# Altium PCB LED_Control.PcbDoc (part 2 of 2)
Units mil, origin at the board's own origin, x right, y up, seen from the top; angles counter-clockwise.
Board outline 2900 x 5000 mil, 4 copper layers (Top Layer, GND1, GND2, Bottom Layer), stack 51.864 mil thick; 104 components, 87 nets, 410 pads, 194 vias.
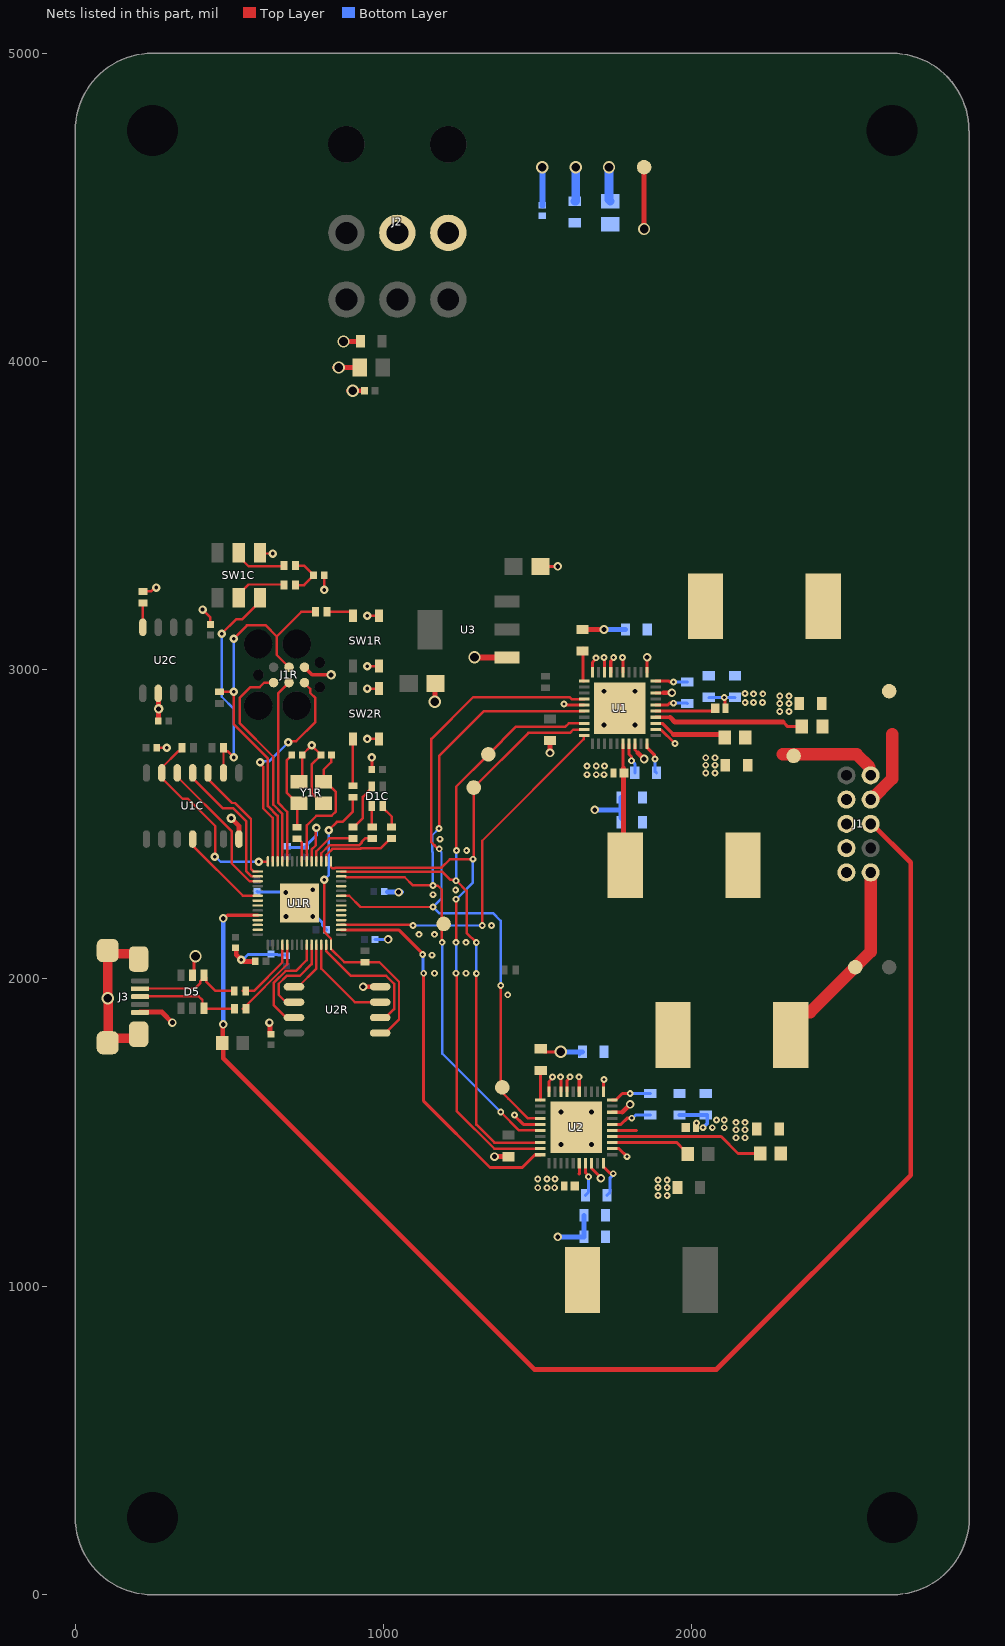
[diagram p4: the nets of this part, all layers, seen from the top]

## Via types
v1: diameter 22, hole 10, Top Layer to Bottom Layer, tented both sides, 103 vias
v2: diameter 27.56, hole 11.81, Top Layer to Bottom Layer, tented both sides, 33 vias
v3: diameter 28, hole 16, Top Layer to Bottom Layer, tented both sides, 20 vias
v4: diameter 31.5, hole 15.75, Top Layer to Bottom Layer, tented both sides, 17 vias
v5: diameter 40, hole 28, Top Layer to Bottom Layer, tented both sides, 14 vias
v6: diameter 45.28, hole 27.56, Top Layer to Bottom Layer, tented both sides, 4 vias
v7: diameter 40, hole 20, Top Layer to Bottom Layer, tented both sides, 3 vias

## Nets (pads, with @x,y where several pads share a name; then routed paths per layer and width w, separated by ;. In a path a pad name is that pad's centre, name@x,y a point inside that pad or via, vN(x,y) a via of type N, cw(c..) or ccw(c..) an arc to the next point about the centre after c; other vN are vias at no path point) (continued)
DBG_TX_RP2040: J1R.5 U1R.27 | length 714.8
  Top Layer w7.87: v2(599.17,2700.16) 599.17,2695.54 609.02,2685.7 609.02,2551.29 640.51,2519.79 U1R.27@640.51,2378.8 ; v2(691.32,2765.12) 694.47,2768.26 716.49,2768.26 778.7,2830.48 778.7,2908.65 761.83,2925.53 761.83,2938.56 743.27,2957.12 J1R.5@743.27,2958.62
  Bottom Layer w7.87: v2(599.17,2700.16) 602.9,2703.88 630.09,2703.88 v2(691.32,2765.12)
DIN_1: U1.10 U1R.3 | length 1212
  Top Layer w8: U1R.3@862.46,2172.6 862.52,2172.53 1093.26,2172.53 v1(1095,2170.8) ; v1(1320.13,2170.8) 1320,2170.92 1320,2445.8 1649.08,2774.88 1649.08,2786.19 1650.08,2787.19 U1.10@1650.5,2787.19
  Bottom Layer w8: v1(1095,2170.8) v1(1320.13,2170.8)
DIN_2: U1R.2 U2.10 | length 1261.3
  Top Layer w9.84: U1R.2@862.46,2156.85 1048.95,2156.85 1126.9,2078.9 v1(1126.9,2076.25) ; v1@1130,2015.8 1130,1600.8 1345,1385.8 1450,1385.8 1491.32,1427.11 1508.92,1427.11 U2.10@1509,1427.19
  Bottom Layer w9.84: v1(1126.9,2076.25) 1128.45,2074.7 1128.45,2017.35 v1@1130,2015.8
  other v1: 1130,2015.96
GND: C1.2 C1C.2 C1R.2 C2.2 C2C.1 C2R.2 C3.2 C3C.2 C3R.2 C4.1 C4C.2 C4R.2 C5.2 C5C.2 C5R.2 C6R.2 C7.2 C7R.2 C8R.2 C9.1 C9R.2 C10.2 C10R.2 C11.2 C11R.2 C12.2 C12R.2 C13.2 C13R.2 C14.2 C15.2 C16.2 C17.1 C18.2 C20.2 C21.2 C22.2 C23.2 C24.2 C25.2 C26.2 C28.1 C29.2 C30.2 D1.2 D2.2 D3.2 D4.2 D5.2 J1.1 J1.3 J1.5 J1.7 J1R.6 J2.2 J3.5 J3.6 J3.7 J3.8 J3.9 R6C.2 SW1C.6 SW1R.B1 SW1R.B2 SW2R.B1 SW2R.B2 U1.5 U1.22 U1.35 U1.37 U1.38 U1.40 U1.41 U1C.7 U1R.19 U1R.57 U2.5 U2.22 U2.35 U2.37 U2.38 U2.40 U2.41 U2C.2 U2R.4 U3.1 Y1R.2 Y1R.4 | length 4979.7
  Top Layer w7.87: R6C.2@219.06,3254.29 245.63,3254.29 258.43,3267.09 v2(262.56,3267.09) ; v2(412.79,3195.6) 438.47,3169.91 438.47,3148.02 C3C.2@438.94,3147.56 ; SW1C.6@599.17,3379.29 601.14,3377.32 v2(640.51,3377.32) ; U1R.57@766.5,2290.71 v4(770.43,2286.77) ; U1R.19@766.5,2378.8 766.5,2417.3 780.42,2431.21 780.42,2485.73 v2(782.24,2487.56) ; v2(807.24,3259.21) C2C.1@807.24,3306.46 ; v2(947.6,2775.94) SW2R.B1@985,2775.94 ; v2(947.6,2939.33) SW2R.B2@985,2939.33 ; v2(947.6,3012.16) 981.14,3012.16 SW1R.B1@981.26,3012.05 ; v2(947.6,3175.55) SW1R.B2@985,3175.55
  Top Layer w8: C1C.2@261.81,2747.4 C1C.2@263.94,2747.4 v2(296.81,2747.4) ; Y1R.2@725.87,2637.16 736.38,2647.68 C2R.2@736.38,2723.78 736.38,2724.57 v2@766.5,2754.68 ; v2(766.5,2755.27) v2@766.5,2754.68 ; Y1R.4@805.87,2567.16 799.96,2567.16 766.43,2600.69 766.43,2692.81 796.61,2722.99 C1R.2@796.61,2723.78 796.61,2724.57 v2@766.5,2754.68 ; SW1R.B1@981.26,3012.05 SW1R.B1@983.94,3014.72
  Top Layer w9.84: C5C.2@961.97,2676.53 v2(961.97,2715.9) ; v1(1425,1555.8) 1425,1554.09 1453.44,1525.64 U2.5@1509,1525.64 ; C13.2@1508.52,3335.8 v3(1565,3335.8) ; C12.2@1510,1770.8 1520,1760.8 v5(1575,1760.8) ; v1(1585,2888.83) 1588.29,2888.83 1591.47,2885.64 U1.5@1650.5,2885.64 ; U2.22@1741,1446.88 1741.08,1446.8 1763.99,1446.8 v1(1790,1420.8) ; U1.22@1882.5,2806.88 1882.58,2806.8 1898.99,2806.8 v1(1945,2760.8) ; C30.2@2207.17,1505.8 C30.2@2212.17,1510.8
  Top Layer w10: D5.2@380,2008.95 385,2013.95 385,2065.8 v5(390,2070.8) ; v5(900,3905) v5@900.4,3905.4 ; C21.2@924.2,4065 C21.2@925,4065.8 ; U2.40@1536.39,1631.8 1536.39,1664.54 1547.6,1675.75 v1(1547.6,1678.99) ; v1(1573.5,1680) 1575.77,1677.72 U2.38@1575.77,1631.8 ; U2.37@1595.46,1631.8 1595.46,1668.14 1605,1677.68 v1(1605,1680) ; U2.35@1634.84,1631.8 v1@1634.84,1678.65 ; U1.40@1677.89,2991.8 1677.89,3024.54 v1@1689.1,3035.75 ; U1.38@1717.28,2991.8 v1@1717.28,3037.72 ; U1.37@1736.96,2991.8 1736.96,3028.14 v1@1746.5,3037.68 ; U1.35@1776.35,2991.8 v1@1776.35,3038.66 ; v1(2105,2910) 2106.85,2908.15 2106.85,2877.65 D2.2@2108.7,2875.8
  Top Layer w11.81: J1R.6@743.27,3008.62 768.18,2983.71 v4(829.81,2983.71)
  Top Layer w15.75: C4C.2@269.06,2834.01 269.74,2834.7 269.74,2872.7 v4(270.43,2873.38) 269.74,2874.07 269.74,2922.89 U2C.2@269.06,2923.58 ; v4(506.12,2518.52) 530.67,2493.98 U1C.7@530.67,2451.14 ; C10R.2@522.4,2100.35 522.18,2100.13 522.18,2075.38 v2(538.15,2059.41) 541.35,2059.41 546.27,2054.49 C4R.2@584.02,2054.49 ; v2(629.83,1855.91) 632.09,1853.65 632.09,1820.83 C3R.2@635,1817.92 ; v3(933.72,1972.01) U2R.4@988.99,1972.01 ; C1.2@1645,3130.8 v3(1715,3130.8)
  Top Layer w16: J3.5@210.31,1889.62 281.18,1889.62 v3(315,1855.8) ; v5@840,3980.8 C22.2@907.6,3980.8 ; v5(870,4065) C21.2@924.2,4065 ; v5@885.4,3905.4 C23.2@937.47,3905.4 ; v5(1166.12,2896.92) 1166.12,2953.4 C14.2@1168.52,2955.8 ; v3(1360,1420.8) C15.2@1405,1420.8 ; v3(1540,2730.8) C2.2@1540,2770.8
  Top Layer w20: v5(1295,3040.8) 1295.28,3040.52 1399.72,3040.52 U3.1@1400,3040.25 ; C30.2@2206.42,1508.09 2207.17,1507.35 C30.2@2207.17,1505.8
  Top Layer w30: J3.8@105,1790.39 119.61,1805 192.44,1805 J3.7@205.39,1817.95 ; J3.8@106.91,1817.95 106.91,1933.09 v5(105,1935) 105,2084.61 110.12,2079.49 188.95,2079.49 205.39,2063.05 J3.6@205.39,2062.85
  Bottom Layer w9.84: v2(538.15,2059.41) 542.94,2059.41 560.27,2076.73 656.26,2076.73 658.16,2074.83 683.1,2074.83 C5R.2@685,2072.92 ; C9R.2@589.33,2281.46 590.92,2279.87 680.89,2279.87 v4(682.48,2278.28) ; C12R.2@689.76,2424.17 C8R.2@746.92,2424.17 ; C8R.2@746.92,2428.07 747.7,2428.07 753.81,2434.17 753.81,2434.96 782.24,2463.4 v2(782.24,2487.56) ; v4(770.43,2200.16) 774.58,2196.01 785.64,2196.01 801.81,2179.84 801.81,2170.94 815.12,2157.64 C13R.2@815.12,2156.85 ; C7R.2@972.6,2125.35 972.82,2125.58 1014.78,2125.58 v3(1015,2125.8) ; C6R.2@1012.13,2280.8 C6R.2@1013.14,2279.78 ; v3@1057.76,2279.78 v3@1058.78,2278.76 ; C16.2@1635,1750.8 C16.2@1645,1760.8
  Bottom Layer w10: C4.1@2055,2910.8 2055.8,2910 2139.2,2910 C5.2@2140,2910.8
  Bottom Layer w12: C18.2@1960,1555.8 C17.1@2045,1555.8 2050,1555.8 2050,1528.7 v1(2036.3,1515)
  Bottom Layer w15.75: v3(1715,3130.8) C3.2@1785,3130.8
  Bottom Layer w16: C6R.2@1013.14,2279.78 v3@1057.76,2279.78 ; v3(1565,1160.8) C29.2@1650,1160.8 C28.1@1650,1230.8 ; v5(1575,1760.8) C16.2@1645,1760.8 ; v3(1685,2545.8) 1770,2545.8 ; C9.1@1770,2585.8 1770,2545.8 ; C10.2@1775,2515.8 1770,2520.8 1770,2545.8
  Bottom Layer w20: C26.2@1515,4507.13 v5(1515,4630.8)
  Bottom Layer w28: C24.2@1620,4520 1622.14,4520 1623.14,4521 v5(1623.14,4630.8) ; v5(1731.27,4630.8) 1731.27,4524.33 C25.2@1735,4520.6
  other v1: 1890,1295 1920,1295 1500,1320 1530,1320 1555,1320 1890,1320.8 1920,1320.8 1890,1345 1920,1345 1500,1348.05 1530,1348.05 1556.4,1348.05 2142.83,1482.3 2172.83,1482.3 2142.83,1508.09 2172.83,1508.09 2066.3,1515 2105,1515 2015,1530 2142.83,1532.3 2172.83,1532.3 2080,1540 2105,1540 1633.5,1680 1402.87,1945.8 1165,2015.8 1267.64,2015.96 1156.72,2074.45 1267.64,2116.28 1115.15,2142.02 1165,2142.02 1350,2170.8 1160,2270.8 1233.78,2285.95 1269.63,2413.67 1182.87,2450.8 1660,2660 1690,2660 1715,2660 2045,2665 2075,2665 1660,2688.05 1690,2688.05 1716.4,2688.05 2045,2690.8 2075,2690.8 2045,2715 2075,2715 2285,2865 2315,2865 2285,2890.8 2315,2890.8 2172.95,2893.81 2200,2894.2 2228.7,2894.2 2285,2915 2315,2915 2200,2922.25 2230.1,2922.25 2172.76,2922.94 1689.1,3038.99 1715,3040 1746.5,3040 1775,3040
  other v3: 1048.78,2278.76
  other v4: 1575,1460.8 1675,1460.8 1575,1565.8 1675,1565.8 683.82,2200.16 1715,2820.8 1815,2820.8 1715,2930.8 1815,2930.8
  other v5: 855,3980.8
"Green Anode": C7.1 J1.10 L1.2 R3.1 TPGreen.TP | length 328.2
  Top Layer w40: 2295,2725.8 TPGreen.TP@2330,2725.8 ; TPGreen.TP@2330,2724.15 2331.39,2724.15 2331.39,2725.75 2331.44,2725.8 2535,2725.8 2576.43,2684.37 2576.43,2661.45 J1.10@2580,2657.88
INT_RP2CAN: U1C.4 U1R.34 | length 297.2
  Top Layer w7.87: U1C.4@380.67,2451.14 380.67,2430.15 543.73,2267.09 U1R.34@589.33,2267.09
LEDB_RP2CAN: R8C.1 U1R.18 | length 168.1
  Top Layer w7.87: U1R.18@782.24,2378.8 782.24,2411.65 823.7,2453.11 R8C.1@900.35,2453.11
LEDG_RP2CAN: R7C.1 U1R.17 | length 213.3
  Top Layer w7.87: U1R.17@797.99,2378.8 797.99,2405.13 823.33,2430.47 920.01,2430.47 929.87,2440.33 929.87,2443.25 939.72,2453.11 R7C.1@963.35,2453.11
LEDR_RP2CAN: R5C.1 U1R.16 | length 255
  Top Layer w7.87: U1R.16@813.74,2378.8 813.74,2398.61 834.19,2419.05 924.74,2419.05 926.44,2420.75 990.05,2420.75 1022.4,2453.11 R5C.1@1026.34,2453.11
MISO: TPmiso.TP U1.9 U1R.15 U2.9 | length 2326.6
  Top Layer w8: U1R.15@829.49,2378.8 829.49,2360.49 834.17,2355.8 840.85,2355.8 843.81,2358.76 1187.96,2358.76 1215,2385.8 v1(1290,2385.8) ; v1(1235,2116.28) v1(1235,2255.8) ; v1@1237.77,2015.96 1237.77,1568.03 1358.92,1446.88 U2.9@1509,1446.88 ; v1@1289.14,2384.94 1292.5,2388.3 TPmiso.TP@1292.5,2618.3 1470,2795.8 1605,2795.8 1615.09,2805.88 1649.5,2805.88 U1.9@1650.5,2806.88
  Bottom Layer w8: v1(1235,2015.96) v1(1235,2116.28) ; v1(1235,2255.8) 1235.98,2255.8 1290,2309.82 v1(1290,2385.8)
MISO_RP2CAN: U1C.12 U1R.31 | length 475
  Top Layer w7.87: U1C.12@330.67,2665.71 330.67,2653.24 507.05,2476.86 507.05,2372.74 565.46,2314.33 U1R.31@591.79,2314.33
MOSI: TPmosi.TP U1.8 U1R.14 U2.8 | length 2241.4
  Top Layer w8: U1R.14@862.46,2345.83 1189.97,2345.83 1217.32,2318.48 1227.32,2318.48 v1@1230,2315.8 ; v1@1232.68,2313.12 1238.96,2313.12 1269.23,2282.85 1269.23,2147.04 1300.92,2115.35 v1(1300.92,2115.19) ; v1(1236.87,2413.67) 1235,2415.55 1235,2620.8 TPmosi.TP@1340,2725.8 1430,2815.8 1590,2815.8 1600.78,2826.57 U1.8@1650.5,2826.57 ; v1(1300.92,2014.87) 1300.92,1524.87 1359.22,1466.57 U2.8@1509,1466.57
  Bottom Layer w8: v1@1230,2315.8 1230,2319.59 1235,2324.59 1235,2411.8 v1(1236.87,2413.67) ; v1@1300.92,2014.71 v1@1300.92,2114.71
  other v1: 1235,2315.8
MOSI_RP2CAN: U1C.11 U1R.30 | length 454.6
  Top Layer w7.87: U1C.11@380.67,2665.71 380.67,2648.97 479.09,2550.55 513.07,2550.55 554.29,2509.33 554.29,2347.77 571.98,2330.08 U1R.30@591.79,2330.08
nCS_RP2CAN: R4C.2 U1C.13 U1R.28 | length 646.2
  Top Layer w7.87: R4C.2@346.22,2747.4 346.22,2743.46 339.33,2736.57 334.8,2736.57 280.67,2682.44 U1C.13@280.67,2665.71 280.67,2648.97 347.86,2581.79 365.18,2581.79 454.29,2492.68 454.29,2395.83 v2(452.74,2394.27) ; v2(595.63,2377.32) 624.76,2377.32 U1R.28@624.76,2378.8
  Bottom Layer w7.87: v2(452.74,2394.27) 455.03,2394.27 471.98,2377.32 v2(595.63,2377.32)
NetC1_1: C1.1 U1.1 | length 110.3
  Top Layer w9.84: C1.1@1646.5,3070.8 1646.5,2964.48 1646.58,2964.4 U1.1@1650.5,2964.4
NetC2C_2: C2C.2 R2C.2 R3C.2 | length 144.3
  Top Layer w7.87: R2C.2@714.33,3274.96 742.28,3274.96 772.99,3305.67 C2C.2@772.99,3306.46 772.99,3307.24 742.28,3337.95 R3C.2@714.33,3337.95
NetC2R_1: C2R.1 R1R.2 Y1R.3 | length 263.4
  Top Layer w8: C2R.1@702.13,2723.78 702.13,2722.99 686.43,2707.3 686.43,2600.69 719.96,2567.16 Y1R.3@725.87,2567.16 719.25,2560.55 R1R.2@719.25,2489.45
NetC6_1: C6.1 U1.30 | length 94
  Top Layer w9.84: U1.30@1882.5,2964.4 1923.65,2964.4 1927.25,2960.8 v1@1930,2960.8
  Bottom Layer w9.84: v1(1940,2960.8) C6.1@1985,2960.8
NetC6_2: C6.2 U1.26 | length 95.5
  Top Layer w9.84: U1.26@1882.5,2885.64 1921.3,2885.64 1927.48,2891.83 v1@1930.23,2891.83
  Bottom Layer w9.84: v1(1940.23,2891.83) 1983.97,2891.83 C6.2@1985,2890.8
NetC8_1: C8.1 U1.17 | length 92.3
  Top Layer w9.84: U1.17@1796.04,2759.8 1796.04,2726.29 1804.3,2718.02 v1@1804.3,2715.27
  Bottom Layer w9.84: v1(1804.3,2705.27) 1805.07,2705.27 1815,2695.34 C8.1@1815,2665.8
NetC8_2: C8.2 U1.20 | length 106.4
  Top Layer w9.84: U1.20@1855.11,2759.8 1855.11,2747.8 1878.06,2724.85 1878.06,2712.74 v1(1880,2710.8)
  Bottom Layer w9.84: v1(1880,2710.8) 1880,2670.8 C8.2@1885,2665.8
NetC12_1: C12.1 U2.1 | length 103.9
  Top Layer w9.84: U2.1@1509,1604.4 1509,1699.8 C12.1@1515,1705.8
NetC19_1: C19.1 U2.30 | length 132.9
  Top Layer w9.84: U2.30@1741,1604.4 1753,1604.4 1774.39,1625.8 v1(1800,1625.8)
  Bottom Layer w9.84: v1(1800,1625.8) C19.1@1865,1625.8
NetC19_2: C19.2 U2.26 | length 136.5
  Top Layer w9.84: U2.26@1741,1525.64 1769.85,1525.64 1790,1545.8 v1(1805,1545.8)
  Bottom Layer w9.84: v1(1805,1545.8) 1807.75,1545.8 1817.75,1555.8 C19.2@1865,1555.8
NetC27_1: C27.1 U2.17 | length 112.5
  Top Layer w9.84: U2.17@1654.53,1399.8 1654.54,1369.55 1665,1359.09 v1(1665,1355.8)
  Bottom Layer w9.84: C27.1@1655,1295.8 1665,1305.8 v1(1665,1355.8)
NetC27_2: C27.2 U2.20 | length 130.8
  Top Layer w9.84: U2.20@1713.6,1399.8 1713.61,1387.8 1733.28,1368.13 1742.67,1368.13 v1(1745,1365.8)
  Bottom Layer w9.84: C27.2@1725,1295.8 1735.08,1305.88 1735.08,1352.59 1745,1362.51 v1(1745,1365.8)
NetD1_1: D1.1 L1.1 U1.16 | length 397.6
  Top Layer w9.84: U1.16@1776.35,2759.8 1776.35,2682.86 1778.4,2680.8
  Top Layer w16: 1777.37,2681.83 1778.4,2680.8 ; D1.1@1778.4,2679.8 1778.4,2665.8 1778.4,2371.4 L1.1@1784,2365.8
NetD1C_1: D1C.1 R5C.2 | length 80.1
  Top Layer w7.87: D1C.1@996.81,2558.42 996.81,2553.5 1026.34,2523.97 R5C.2@1026.34,2490.51
NetD1C_2: D1C.2 R7C.2 | length 68.7
  Top Layer w7.87: D1C.2@961.38,2558.42 961.38,2492.48 R7C.2@963.35,2490.51
NetD1C_3: D1C.3 R8C.2 | length 158.5
  Top Layer w7.87: R8C.2@900.35,2490.51 904.29,2490.51 932.83,2519.05 932.83,2587.95 961.38,2616.49 D1C.3@961.38,2621.42
NetD2_1: D2.1 L2.2 U1.25 | length 197.3
  Top Layer w9.84: U1.25@1882.5,2865.95 2066.22,2865.95 2075.3,2875.03 D2.1@2075.3,2875.8
NetD3_1: D3.1 L3.1 U2.16 | length 34.4
  Top Layer w9.84: 1634.7,1365.5 1634.85,1365.64 U2.16@1634.84,1399.8
NetD4_1: D4.1 L4.2 U2.25 | length 79.1
  Top Layer w9.84: U2.25@1741,1505.95 1819.85,1505.95 1820,1505.8
NetR2_2: R2.2 U1.24 | length 486.6
  Top Layer w10: U1.24@1882.5,2846.26 1929.54,2846.26 ; 2296.09,2830.8 2311.09,2815.8 R2.2@2356.5,2815.8
  Top Layer w16: 1929.54,2846.26 1945,2830.8 2296.09,2830.8
NetR2C_1: R2C.1 SW1C.2 | length 172.3
  Top Layer w7.87: SW1C.2@530.28,3233.62 530.28,3245.43 561.77,3276.93 674.96,3276.93 R2C.1@676.93,3274.96
NetR3_2: R3.2 U1.23 | length 243
  Top Layer w9.84: U1.23@1882.5,2826.57 1882.58,2826.5 1904.3,2826.5 1940,2790.8
  Top Layer w16: 1940,2790.8 2096.5,2790.8 R3.2@2106.5,2780.8
NetR3C_1: R3C.1 SW1C.5 | length 172.3
  Top Layer w7.87: SW1C.5@530.28,3379.29 530.28,3367.48 561.77,3335.98 674.96,3335.98 R3C.1@676.93,3337.95
NetR5_2: R5.2 U2.24 | length 503.7
  Top Layer w9.84: U2.24@1741,1486.26 2095,1486.26 2150,1431.26 R5.2@2221.97,1431.26
NetR6_2: R6.2 U2.23 | length 261.1
  Top Layer w9.84: U2.23@1741,1466.57 1769.22,1466.57 1951.41,1466.57 1954.37,1463.61 1971.42,1445.77 R6.2@1986.5,1430
NetR6C_1: R6C.1 U2C.8 | length 78.7
  Top Layer w7.87: U2C.8@219.06,3138.15 R6C.1@219.06,3216.89
NetR6R_1: R6R.1 SW1R.A2 | length 91.3
  Top Layer w7.87: R6R.1@816.69,3188.35 891.5,3188.35 900.35,3179.49 SW1R.A2@900.35,3175.55
NetR7R_1: R7R.1 SW2R.A1 | length 151.6
  Top Layer w7.87: R7R.1@900.35,2624.37 SW2R.A1@900.35,2775.94
NetU1R_4: U1R.4
NetU1R_5: U1R.5
NetU1R_6: U1R.6
NetU1R_7: U1R.7
NetU1R_11: U1R.11
NetU1R_35: U1R.35
NetU1R_36: U1R.36
NetU1R_39: U1R.39
NetU1R_40: U1R.40
NetU1R_41: U1R.41
PWM_CLK: TP6.TP U1.4 U1R.9 U2.4 | length 2400.3
  Top Layer w8: U1R.9@862.46,2267.09 888.71,2267.09 925,2230.8 v1(1160,2230.8) ; v1(1180.69,2419.49) 1176.9,2419.49 1165.65,2430.74 1165.06,2430.74 1155,2440.8 1155,2775.8 1290.9,2911.7 1603.33,2911.7 1609.7,2905.33 U1.4@1650.5,2905.33 ; v1(1380,1975.8) 1380,1650.8 TP6.TP@1385,1645.8 1382.17,1642.98 1379.8,1640.61 1379.8,1633.99 1379.97,1633.81 1404.44,1609.34 1468.45,1545.33 U2.4@1509,1545.33
  Bottom Layer w8: v1(1180.69,2419.49) 1180.69,2415.7 1187.87,2408.51 1187.87,2258.67 v1(1160,2230.8) 1180,2210.8 1355,2210.8 1380,2185.8 v1(1380,1975.8)
QSPI_SCLK_RP2040: U1R.52 U2R.6 | length 286.6
  Top Layer w7.87: U2R.6@705.47,1922.01 683.82,1922.01 660.2,1945.63 660.2,1981.79 685.65,2007.24 728.31,2007.24 766.5,2045.43 U1R.52@766.5,2108.13
QSPI_SD0_RP2040: U1R.53 U2R.5 | length 178.4
  Top Layer w7.87: U2R.5@705.47,1972.01 723.39,1972.01 782.24,2030.86 U1R.53@782.24,2108.13
QSPI_SD1_RP2040: U1R.55 U2R.2 | length 427.3
  Top Layer w7.87: U1R.55@813.74,2108.13 813.74,2088.32 894.82,2007.24 1008.82,2007.24 1034.27,1981.79 1034.27,1912.22 1034.21,1912.16 1034.21,1899.57 1006.65,1872.01 U2R.2@985,1872.01
QSPI_SD2_RP2040: U1R.54 U2R.3 | length 309.4
  Top Layer w7.87: U1R.54@797.99,2108.13 797.99,2030.86 906.85,1922.01 U2R.3@985,1922.01
QSPI_SD3_RP2040: U1R.51 U2R.7 | length 337.5
  Top Layer w7.87: U2R.7@705.47,1872.01 683.82,1872.01 644.45,1911.38 644.45,1985.4 682.53,2023.48 715.58,2023.48 750.75,2058.65 U1R.51@750.75,2108.13
QSPI_SS_RP2040: R5R.2 R7R.2 U1R.56 U2R.1 | length 1007.5
  Top Layer w7.87: v2(807.84,2318.91) 807.84,2149.59 829.49,2127.94 U1R.56@829.49,2108.13 ; v2(821.61,2479.68) 848.74,2506.81 867.15,2506.81 900.35,2540.01 R7R.2@900.35,2586.97 ; U1R.56@829.49,2094.84 872.8,2051.53 R5R.2@939.72,2051.53 986.8,2051.53 1050.02,1988.31 1050.02,1865.37 1006.65,1822.01 U2R.1@985,1822.01
  Bottom Layer w7.87: v2(807.84,2318.91) 807.84,2319.58 821.61,2333.36 v2(821.61,2479.68)
"Red Anode": C11.1 J1.8 L2.1 R2.1 TPRed.TP | length 242.2
  Top Layer w40: J1.8@2580,2579.14 2582.16,2579.14 2650.19,2647.17 2650.19,2790.99
RUN_RP2040: J1R.4 R4R.2 R6R.2 U1R.26 | length 1275.3
  Top Layer w7.87: R4R.2@467.28,2928.5 v2(514.53,2928.5) 514.53,2822.96 624.76,2712.72 624.76,2557.81 656.26,2526.31 U1R.26@656.26,2378.8 ; v2(514.53,3100.41) 514.53,3101.73 556.85,3144.06 618.3,3144.06 653.7,3108.65 ; J1R.4@693.27,3008.62 653.7,3048.18 653.7,3108.65 ; R6R.2@779.29,3188.35 733.4,3188.35 653.7,3108.65
  Bottom Layer w7.87: v2(514.53,2928.5) v2(514.53,3100.41)
SCK_RP2CAN: U1C.10 U1R.29 | length 400.1
  Top Layer w7.87: U1C.10@430.67,2665.71 430.67,2645.46 508.04,2568.09 517.81,2568.09 570.04,2515.86 570.04,2354.29 578.5,2345.83 U1R.29@591.79,2345.83
SCK_SPI: TPsck.TP U1.6 U1R.13 U2.6 | length 2249.1
  Top Layer w8: U1R.13@875.68,2330.01 878.43,2327.27 1068.53,2327.27 1095,2300.8 v1(1160,2300.8) 1160.76,2300.04 1175.76,2300.04 1188.75,2287.05 1188.75,2112.05 v1@1190,2110.8 ; v1(1180,2485.8) 1180,2720.8 1325.15,2865.95 U1.6@1650.5,2865.95 ; TPsck.TP@1195,2175.8 TPsck.TP@1197.31,2173.49 ; v1(1380,1565.8) 1439.85,1505.95 U2.6@1509,1505.95
  Bottom Layer w8: v1(1160,2300.8) 1160,2407.83 1157.81,2410.02 1157.81,2463.61 v1(1180,2485.8) ; v1@1190,2110.8 1191,2109.8 1191,1754.8 v1(1380,1565.8)
  other v1: 1190,2116.28
SWCLK_RP2040: J1R.3 U1R.24 | length 606.9
  Top Layer w7.87: U1R.24@687.76,2378.8 687.76,2539.36 657.83,2569.28 657.83,2923.18 J1R.3@693.27,2958.62
SWDIO_RP2040: J1R.1 U1R.25 | length 718.6
  Top Layer w7.87: J1R.1@643.27,2958.62 612.73,2958.62 598.16,2944.06 568.23,2944.06 532.83,2908.65 532.83,2827.41 642.08,2718.15 642.08,2562.76 672.01,2532.84 U1R.25@672.01,2378.8
Temp_Sense: J1.6 R7.2 U1R.38 | length 4662.8
  Top Layer w10: v3(480,2194.03) 483.1,2194.03 493.17,2204.09 U1R.38@591.79,2204.09
  Top Layer w16: R7.2@480,1785.21 480,1740 1489.2,730.8 2080,730.8 2710,1360.8 2710,2375 J1.6@2582.3,2502.7 ; v3(480,1850) 478.25,1848.25 478.25,1803.16 R7.2@482.7,1798.7
  Bottom Layer w16: v3(480,1850) v3(480,2194.03)
TERM_DET_RP2CAN: R1C.2 SW1C.3 U1C.9 | length 723.9
  Top Layer w7.87: v2(475.16,3117.48) 521.23,3163.55 540.91,3163.55 599.17,3221.81 SW1C.3@599.17,3233.62 ; U1C.9@480.67,2665.71 R1C.2@480.67,2743.46 ; R1C.2@480.67,2747.4 R1C.2@480.67,2743.46 ; v2(514.53,2715.9) 493.86,2736.57 487.56,2736.57 R1C.2@480.67,2743.46
  Bottom Layer w7.87: v2(475.16,3117.48) 475.16,2912.75 514.53,2873.38 v2(514.53,2715.9)
USB_N: D5.1 J3.2 R3R.1 | length 339
  Top Layer w8: J3.2@220,1966.39 387.75,1966.39 405.81,1984.45 405.81,1990.47 417.4,2002.06 D5.1@417.4,2008.95 425.21,2001.14 425.21,1988.11 454.53,1958.8 R3R.1@505.45,1958.8
USB_P: D5.6 J3.3 R2R.1 | length 310.4
  Top Layer w8: J3.3@225,1941.01 400.32,1941.01 412.66,1928.66 412.66,1907.39 D5.6@417.4,1902.65 419.25,1900.8 R2R.1@506.3,1900.8
USB_RP2040_N: R3R.2 U1R.46 | length 224.3
  Top Layer w7.87: R3R.2@542.86,1958.8 579.43,1958.8 672.01,2051.38 U1R.46@672.01,2108.13
USB_RP2040_P: R2R.2 U1R.47 | length 267
  Top Layer w7.87: R2R.2@543.7,1900.8 687.76,2044.85 U1R.47@687.76,2108.13
V+: C3.1 C4.2 C5.1 C9.2 C10.1 C16.1 C17.2 C18.1 C24.1 C25.1 C26.1 C28.2 C29.1 J2.3 TP3.TP U1.18 U1.28 U1.31 U2.18 U2.28 U2.31 | length 534.1
  Top Layer w9.84: U2.18@1674.22,1399.8 1674.3,1399.72 1674.3,1383.38 1705,1352.68 v3(1705,1350.8) ; U2.31@1713.6,1631.8 1713.61,1667.74 1715,1669.13 v1(1715,1670.8) ; U2.28@1741,1565.02 1770,1565.02 1774.22,1565.02 ; U1.18@1815.72,2759.8 1815.8,2759.72 1815.8,2740.25 1825,2731.05 ; v3(1855,3040.8) 1855.05,3040.75 1855.05,2991.85 U1.31@1855.11,2991.8 ; U1.28@1882.58,2924.94 1907.39,2924.94
  Top Layer w16: 1774.22,1565.02 v3(1800,1590.8) ; 1825,2730.8 v3(1845,2710.8) ; v5(1845,4430) TP3.TP@1845,4630.8 ; 1907.39,2925.8 v3(1935,2925.8)
"White Anode": C30.1 J1.2 L4.1 R5.1 TPWhite.TP | length 549.9
  Top Layer w40: L4.1@2368.58,1889.38 2383.58,1889.38 2580,2085.8 J1.2@2580,2342.92
XIN_RP2040: C1R.1 U1R.20 Y1R.1 | length 443.1
  Top Layer w7.87: U1R.20@750.75,2378.8 750.75,2495.43 782.24,2526.93 831.55,2526.93 845.24,2540.62 845.24,2603.7 811.77,2637.16 Y1R.1@805.87,2637.16 805.87,2676.44 829.59,2700.16 829.59,2722.5 C1R.1@830.87,2723.78
XOUT_RP2040: R1R.1 U1R.21 | length 82.1
  Top Layer w7.87: R1R.1@719.25,2452.05 723.19,2452.05 735,2440.24 U1R.21@735,2378.8
pads on no net: D5.3 D5.4 J1R.A J1R.B J1R.C J1R.D J1R.E J1R.F J1R.G J2. J2.6 J3.1 J3.4 SW1R.A1 SW2R.A2 U1.2 U1.11 U1.12 U1.13 U1.14 U1.15 U1.19 U1.21 U1.27 U1.29 U1.32 U1.33 U1.34 U1.36 U1.39 U1C.3 U1C.5 U1C.8 U2.2 U2.11 U2.12 U2.13 U2.14 U2.15 U2.19 U2.21 U2.27 U2.29 U2.32 U2.33 U2.34 U2.36 U2.39

## Polygon pours and split planes (outlines as drawn)
3V3 on Top Layer "3V3_L01_P020" (solid, pour order 20): 520,1815 520,1760 575,1760 575,1815
3V3 on Top Layer "3V3_L01_P000" (solid, remove dead copper, pour order 0): 135,2275.49 586.06,1733.13 1114.49,1733.13 1114.49,3183.34 140,3175
GND on Top Layer "GND_L01_P019" (solid, pour order 19): 2120,1555.05 2120,1500 2005,1500 2005,1555.05
GND on Top Layer "GND_L01_P018" (solid, pour order 18): 2245,2934.25 2245,2860 2095,2860 2095,2934.25
GND on Top Layer "GND_L01_P017" (solid, pour order 17): 1755.98,2700.05 1755.98,2645.05 1645,2645.05 1645,2700.05
GND on Top Layer "GND_L01_P016" (solid, pour order 16): 1595.98,1360.05 1595.98,1305.05 1485,1305.05 1485,1360.05
GND on Top Layer "GND_L01_P015" (solid, pour order 15): 1970,1360 1970,1280 1875,1280 1875,1360
GND on Top Layer "GND_L01_P014" (solid, pour order 14): 2365,2930 2365,2850 2270,2850 2270,2930
GND on Top Layer "GND_L01_P013" (solid, pour order 13): 2222.83,1547.3 2222.83,1467.3 2127.83,1467.3 2127.83,1547.3
GND on Top Layer "GND_L01_P012" (solid, pour order 12): 2125,2730 2125,2650 2030,2650 2030,2730
3V3 on Top Layer "3V3_L01_P006" (solid, remove dead copper, pour order 6): 1114.49,3183.34 1117.03,3180.8 1555,3180.8 1555,2960.8 1490,2960.8 1490,3035.8 1440,3085.8 1125,3085.8 1114.49,3085.8
+5V on Top Layer "+5V_L01_P007" (solid, remove dead copper, pour order 7): 960,4265 1125,4265 1125,4125 1450,3800 1450,3195.8 1235,3195.8 960,3406.63
NetD3_1 on Top Layer "NETD3_1_L01_P010" (solid, pour order 10): 1588.07,985.8 1700,985.8 1700,1325.8 1655,1325.8 1640,1340.8 1640,1370.8 1630,1370.8 1605,1345.8 1605,1295.8 1588.07,1278.86
"Blue Anode" on Top Layer "BLUE_ANODE_L01_P011" (solid, pour order 11): 1978.56,1030.8 1978.56,1300.8 1978.56,1355 2030,1355 2030,1455 2083.34,1455 2083.34,1030.8
V+ on Bottom Layer "V+_L04_P001" (solid, remove dead copper, pour order 1): 2170,4485 2170,1030.8 1465,1030.8 1465,4345 1130,4345 1130,4485
GND on GND2 (split plane): 2661.56,4979.63 2674.41,4978.54 2687.19,4976.74 2699.84,4974.22 2712.33,4971 2724.62,4967.08 2736.68,4962.48 2748.45,4957.21 2759.91,4951.29 2771.02,4944.74 2781.75,4937.57 2792.06,4929.81 2801.91,4921.49 2811.29,4912.63 2820.15,4903.25 2828.48,4893.4 2836.23,4883.09 2843.4,4872.36 2849.95,4861.25 2855.88,4849.79 2861.14,4838.01 2865.75,4825.96 2869.66,4813.67 2872.89,4801.18 2875.4,4788.52 2877.21,4775.75 2878.29,4762.9 2878.63,4750.61 2878.58,4750 2878.56,4750 2878.57,4749.92 2878.57,4749.84 2878.77,4747.95 2878.95,4746.08 2878.97,4746 2878.98,4745.92 2879.55,4744.12 2879.9,4742.94 2879.9,251.2 2879.79,250 2879.85,249.31 2879.51,237.1 2878.43,224.25 2876.62,211.48 2874.11,198.82 2870.88,186.33 2866.97,174.04 2862.37,161.99 2857.1,150.21 2851.18,138.75 2844.62,127.64 2837.45,116.91 2829.7,106.6 2821.37,96.75 2812.51,87.37 2803.14,78.51 2793.28,70.19 2782.97,62.43 2772.24,55.26 2761.13,48.71 2749.67,42.79 2737.9,37.52 2725.84,32.92 2713.55,29 2701.06,25.78 2688.41,23.26 2675.63,21.46 2662.78,20.37 2650.57,20.03 2649.88,20.1 250,20.1 249.31,20.03 237.1,20.37 224.25,21.46 211.48,23.26 198.82,25.78 186.33,29 174.04,32.92 161.99,37.52 150.21,42.79 138.75,48.71 127.64,55.26 116.91,62.43 106.6,70.19 96.75,78.51 87.37,87.37 78.51,96.75 70.19,106.6 62.43,116.91 55.26,127.64 48.71,138.75 42.79,150.21 37.52,161.99 32.92,174.04 29,186.33 25.78,198.82 23.26,211.48 21.46,224.25 20.37,237.1 20.03,249.31 20.1,250 20.1,4750 20.03,4750.69 20.37,4762.9 21.46,4775.75 23.26,4788.52 25.78,4801.18 29,4813.67 32.92,4825.96 37.52,4838.01 42.79,4849.79 48.71,4861.25 55.26,4872.36 62.43,4883.09 70.19,4893.4 78.51,4903.25 87.37,4912.63 96.75,4921.49 106.6,4929.81 116.91,4937.57 127.64,4944.74 138.75,4951.29 150.21,4957.21 161.99,4962.48 174.04,4967.08 186.33,4971 198.82,4974.22 211.48,4976.74 224.25,4978.54 237.1,4979.63 249.31,4979.97 250,4979.9 2648.66,4979.9 2649.35,4979.97
GND on GND1 (split plane): 2661.56,4979.63 2674.41,4978.54 2687.19,4976.74 2699.84,4974.22 2712.33,4971 2724.62,4967.08 2736.68,4962.48 2748.45,4957.21 2759.91,4951.29 2771.02,4944.74 2781.75,4937.57 2792.06,4929.81 2801.91,4921.49 2811.29,4912.63 2820.15,4903.25 2828.48,4893.4 2836.23,4883.09 2843.4,4872.36 2849.95,4861.25 2855.88,4849.79 2861.14,4838.01 2865.75,4825.96 2869.66,4813.67 2872.89,4801.18 2875.4,4788.52 2877.21,4775.75 2878.29,4762.9 2878.63,4750.61 2878.58,4750 2878.56,4750 2878.57,4749.92 2878.57,4749.84 2878.77,4747.95 2878.95,4746.08 2878.97,4746 2878.98,4745.92 2879.55,4744.12 2879.9,4742.94 2879.9,251.2 2879.79,250 2879.85,249.31 2879.51,237.1 2878.43,224.25 2876.62,211.48 2874.11,198.82 2870.88,186.33 2866.97,174.04 2862.37,161.99 2857.1,150.21 2851.18,138.75 2844.62,127.64 2837.45,116.91 2829.7,106.6 2821.37,96.75 2812.51,87.37 2803.14,78.51 2793.28,70.19 2782.97,62.43 2772.24,55.26 2761.13,48.71 2749.67,42.79 2737.9,37.52 2725.84,32.92 2713.55,29 2701.06,25.78 2688.41,23.26 2675.63,21.46 2662.78,20.37 2650.57,20.03 2649.88,20.1 250,20.1 249.31,20.03 237.1,20.37 224.25,21.46 211.48,23.26 198.82,25.78 186.33,29 174.04,32.92 161.99,37.52 150.21,42.79 138.75,48.71 127.64,55.26 116.91,62.43 106.6,70.19 96.75,78.51 87.37,87.37 78.51,96.75 70.19,106.6 62.43,116.91 55.26,127.64 48.71,138.75 42.79,150.21 37.52,161.99 32.92,174.04 29,186.33 25.78,198.82 23.26,211.48 21.46,224.25 20.37,237.1 20.03,249.31 20.1,250 20.1,4750 20.03,4750.69 20.37,4762.9 21.46,4775.75 23.26,4788.52 25.78,4801.18 29,4813.67 32.92,4825.96 37.52,4838.01 42.79,4849.79 48.71,4861.25 55.26,4872.36 62.43,4883.09 70.19,4893.4 78.51,4903.25 87.37,4912.63 96.75,4921.49 106.6,4929.81 116.91,4937.57 127.64,4944.74 138.75,4951.29 150.21,4957.21 161.99,4962.48 174.04,4967.08 186.33,4971 198.82,4974.22 211.48,4976.74 224.25,4978.54 237.1,4979.63 249.31,4979.97 250,4979.9 2648.66,4979.9 2649.35,4979.97

## Keep-outs
Keep-Out Layer:
  region: 2395.45,253.34 cw(c2645.45,253.34) 2645.45,503.34 2895.45,503.34 2895.45,253.34 cw(c2645.45,253.34) 2645.45,3.34 2395.45,3.34
  region: 2645.64,4996.51 cw(c2645.64,4746.51) 2895.64,4746.51 2895.64,4496.51 2645.64,4496.51 cw(c2645.64,4746.51) 2395.64,4746.51 2395.64,4996.51
  region: 252.11,4994.41 ccw(c252.11,4744.41) 2.11,4744.41 2.11,4494.41 252.11,4494.41 ccw(c252.11,4744.41) 502.11,4744.41 502.11,4994.41
  region: 505,255 ccw(c255,255) 255,505 5,505 5,255 ccw(c255,255) 255,5 505,5
  lines w10: 2648.66,5000 cw(c2648.66,4750) 2898.66,4750 ; 2649.88,5000 250,5000 ccw(c250,4750) 0,4750 0,250 ccw(c250,250) 250,0 2649.88,0 ccw(c2649.88,250) 2899.88,250 ; 2900,250 2900,4748.03

## Other copper
Top Layer:
  region net NetD2_1: 2085,3122.81 2085,2855.8 1961.66,2855.8 1961.66,2871.15 1987.01,2870.8 1987.01,3122.81
  pour cut-out: 213.94,2655.43 213.94,2445.43 218.94,2440.43 468.94,2440.43 468.94,2580.43 408.94,2670.43
  pour cut-out: 729.71,2315.43 779.71,2365.43 824.71,2365.43 824.71,2275.43 789.71,2275.43
  pour cut-out: 836.8,2225.21 836.58,2225.43 619.83,2225.43 619.83,2172.82 647.15,2145.5 719.76,2145.5 734.83,2130.43 834.83,2130.43
  region net "Red Anode": 2375,3145.8 2375,2925.8 2385,2915.8 2385,2775.8 2670,2775.8 2670,2955.67 2480.34,3145.8
  region net "Green Anode": 2140,2810.8 2140,2265 2310,2265 2310,2665.8 2361.44,2705.8 2361.44,2747.24 2278.66,2810.8
  pour cut-out: 849.62,2523.24 849.66,2523.28 870.05,2523.28 868.93,2723.85 857.42,2735.37 852.77,2735.37 852.77,2699.8 828.71,2675.74 828.71,2653.58 843.73,2638.56 843.73,2628.56
  region net NetD1_1: 1835,2350.8 1730,2350.8 1730,2605.8 1765,2640.8 1765,2690.8 1765,2730.72 1781.59,2730.72 1781.59,2685.8 1835,2685.8
  region net NetD4_1: 1884.92,1810.8 1995,1810.8 1995,1500.8 1805,1500.8 1805,1510.8 1815,1520.8 1880,1520.8
  region net "White Anode": 2270,1380.8 2410,1380.8 2420,1390.8 2420,1925.8 2270,1925.8
  pour cut-out: 591.09,3026.01 601.83,3021.95 634.72,3021.95 640.78,3028.01 640.78,3058.01 615.78,3058.01 605.78,3048.01

## Silkscreen, mask and mechanical layers (free items; w line width, h text height)
Top Overlay:
  drawing of 19 lines, arcs and shapes, not listed
  text "TERM / ON" at 418.93,3228.15 h40 r90
  text "RESET" at 1063.45,3000.55 h40 r90
  text "BOOT" at 1063.45,2784.33 h40 r90
  text "The Underwater Robotics Team" at 600,165 h60
  text "LED Control" at 615,50 h60

## Text inside footprints (layer, text, board x,y; h text height)
J1: Top Overlay "10" at 2605,2764.18 h50 r90; Top Overlay "9" at 2526.26,2764.18 h50 r90; Top Overlay "2" at 2605,2191.11 h50 r90; Top Overlay "1" at 2526.26,2191.11 h50 r90
U1: Top Overlay "*" at 1585,2950.8 h50; Mechanical 13 "*" at 1655,2949.25 h50
U2: Top Overlay "*" at 1465,1635.8 h30; Mechanical 13 "*" at 1513.5,1589.25 h50